# Altium PCB NB3000XN.PcbDoc (part 37 of 71)
Units mil, origin at the board's own origin, x right, y up, seen from the top; angles counter-clockwise.
Board outline 9527.56 x 6929.77 mil, 6 copper layers (Top Layer, GND+SHIELD, MidLayer1, MidLayer2, P2 - 3V3+5V0, Bottom Layer), stack 62.375 mil thick; 832 components, 1027 nets, 4655 pads, 4981 vias.
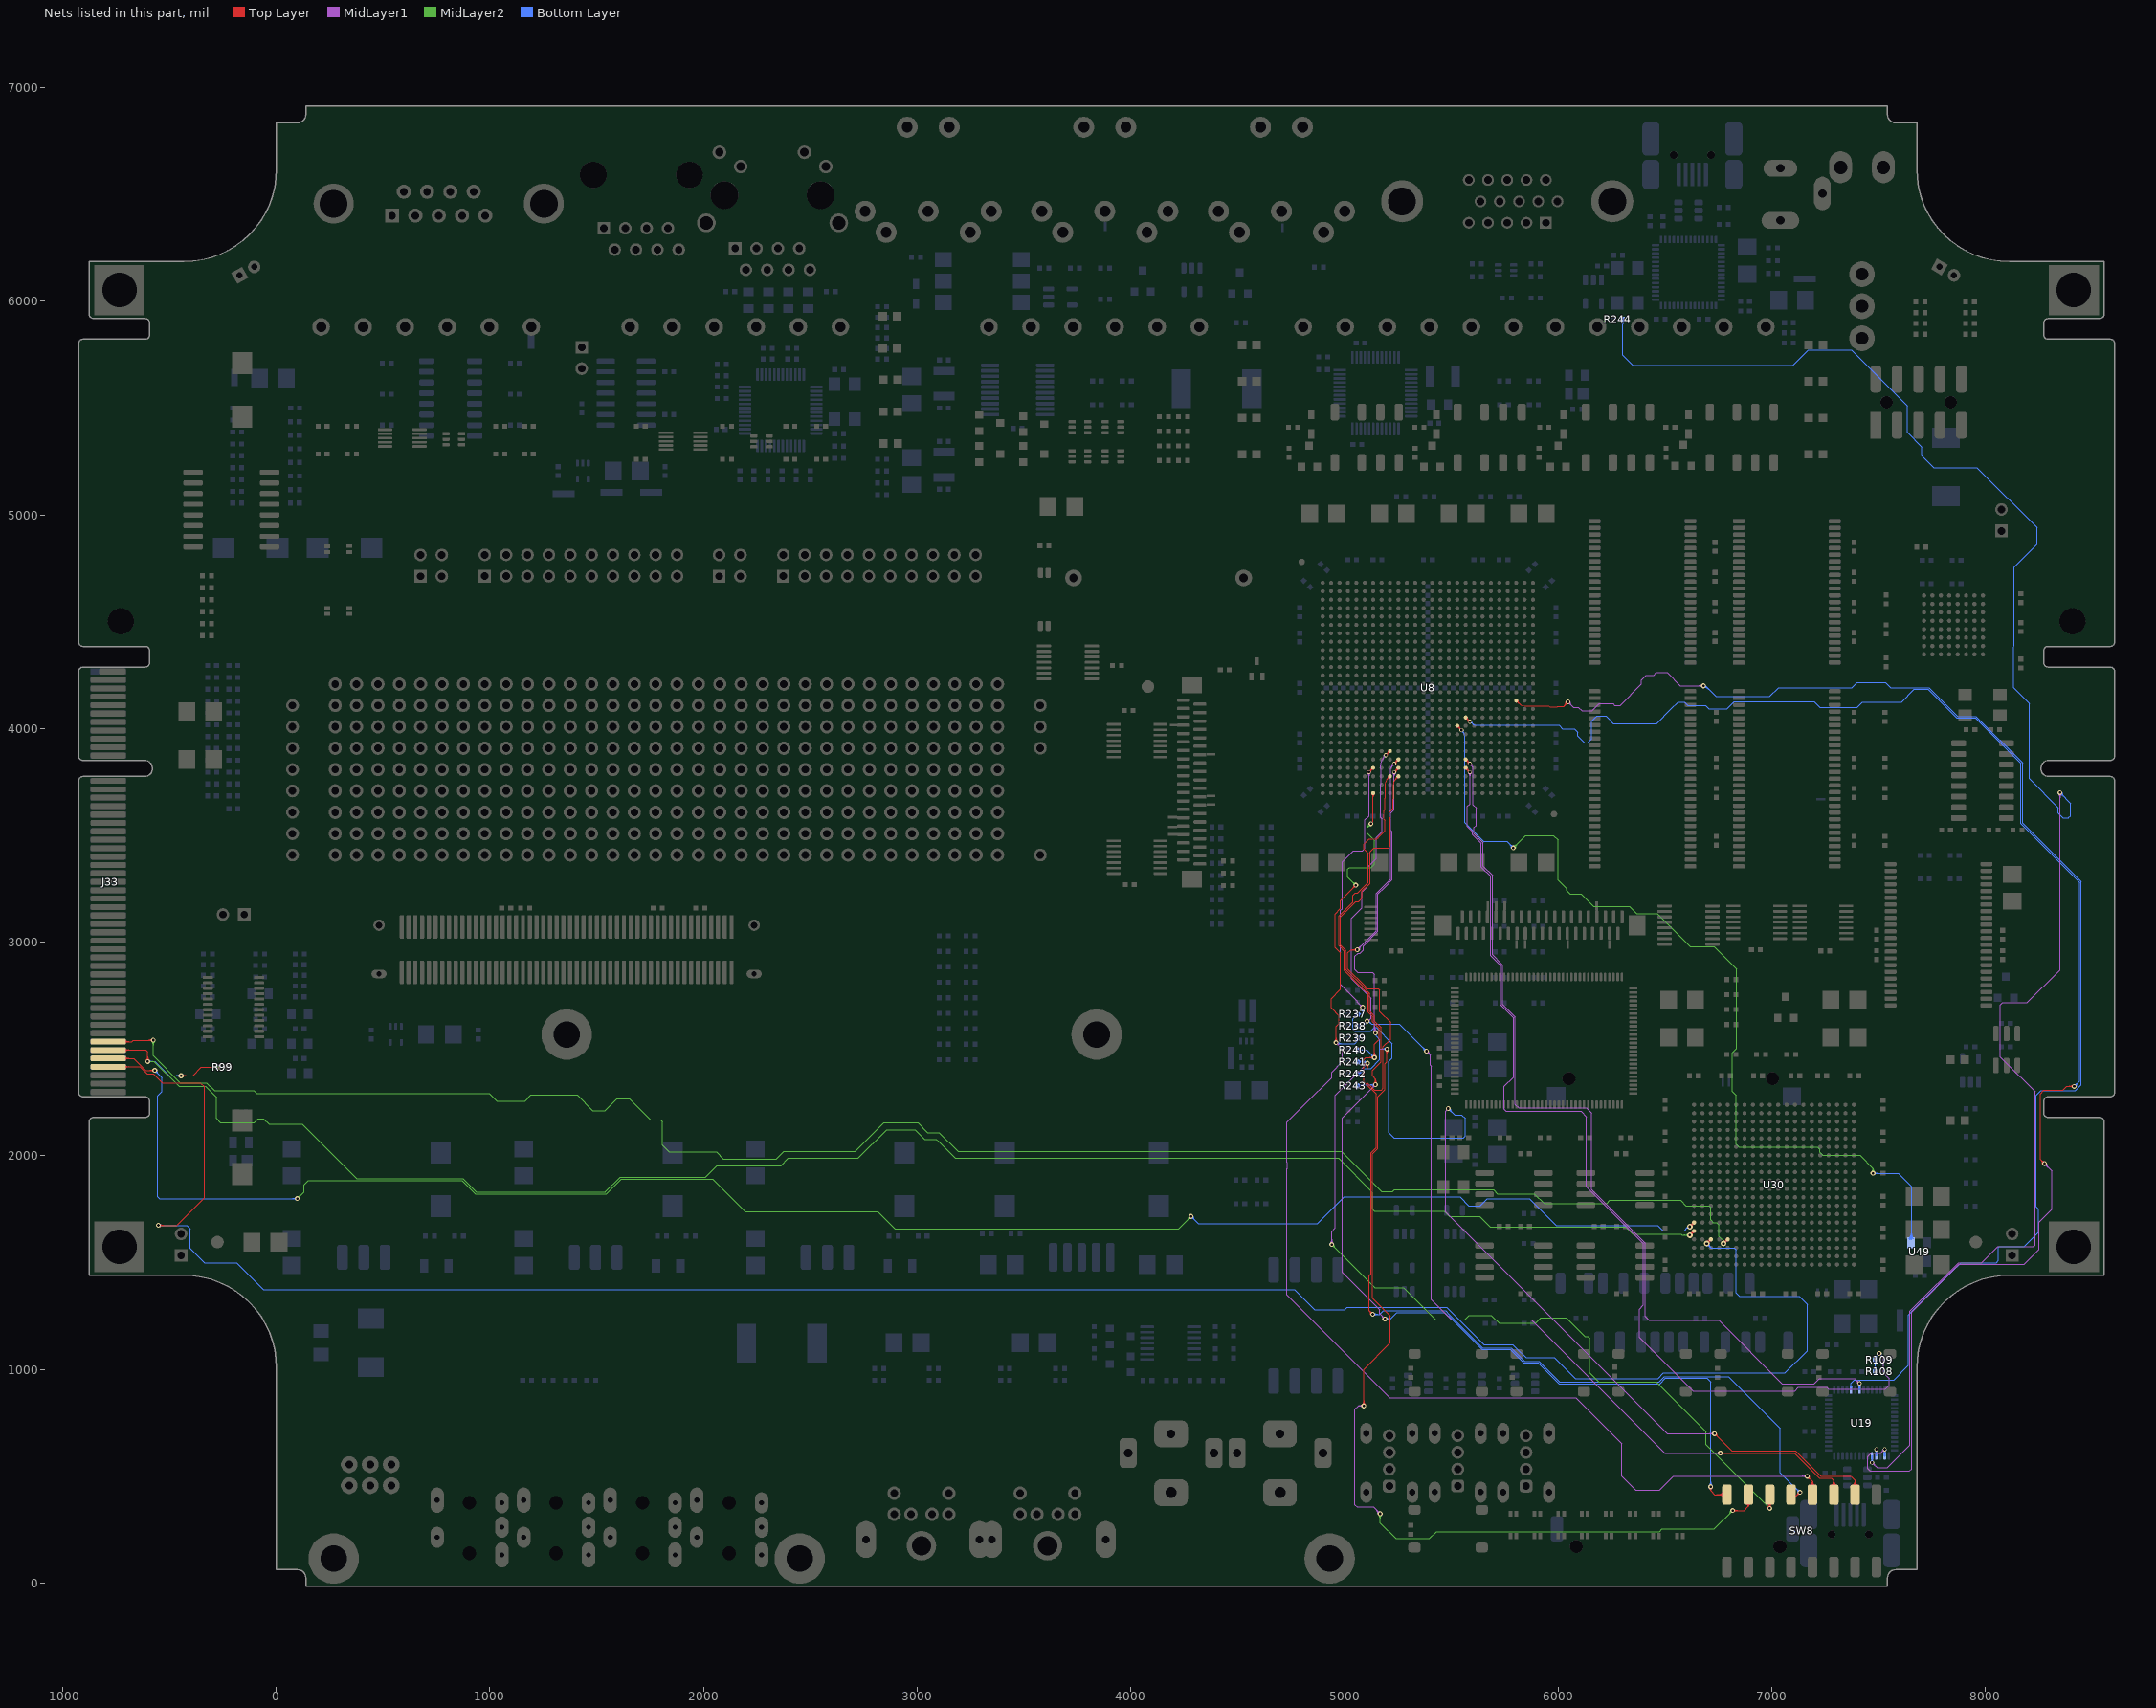
[diagram p41: the nets of this part, all layers, seen from the top]

## Via types
v1: diameter 23, hole 11.81, Top Layer to Bottom Layer, 3672 vias
v2: diameter 26, hole 11.81, Top Layer to Bottom Layer, 461 vias
v3: diameter 19, hole 11.81, Top Layer to Bottom Layer, tented both sides, 396 vias
v4: diameter 23.62, hole 11.81, Top Layer to Bottom Layer, 288 vias
v5: diameter 20, hole 11.81, Top Layer to Bottom Layer, 91 vias
v6: diameter 23, hole 11.81, Top Layer to Bottom Layer, tented both sides, 50 vias
v7: diameter 31, hole 11.81, Top Layer to Bottom Layer, 15 vias
v8: diameter 27.56, hole 11.81, Top Layer to Bottom Layer, tented both sides, 4 vias
v9: diameter 29, hole 11.81, Top Layer to Bottom Layer, 3 vias
v10: diameter 21, hole 11.81, Top Layer to Bottom Layer, 1 vias

## Nets (pads, with @x,y where several pads share a name; then routed paths per layer and width w, separated by ;. In a path a pad name is that pad's centre, name@x,y a point inside that pad or via, vN(x,y) a via of type N, cw(c..) or ccw(c..) an arc to the next point about the centre after c; other vN are vias at no path point) (continued)
DBUSB.READY: U8.R24 U19.33 | length 6898
  Top Layer w4: U8.R24@5803.39,4123.6 cw(c5803.39,4105.88) 5815.92,4118.41 ; U8.R24@5810.73,4130.94 ccw(c5828.45,4130.94) 5815.92,4118.41 ; v1@6036.69,4125.04 cw(c6013.76,4125.04) 6029.97,4108.82 cw(c6046.19,4092.61) v1@6046.19,4115.54 ; v1@6037.01,4125.04 v1(6046.19,4125.04) 6026,4104.85 5997.48,4104.85 5994.33,4101.71 5960.72,4101.71 5955.35,4107.08 5924.74,4107.08 5920,4107.08 5910,4107.08 5843.27,4107.08 cw(c5843.27,4145.76) 5815.92,4118.41 ; v1@6040.69,4125.04 cw(c6027.41,4125.04) 6036.8,4115.65 cw(c6046.19,4106.26) v1@6046.19,4119.54
  MidLayer1 w4: v1@6046.19,4115.54 cw(c6046.19,4092.61) 6062.41,4108.82 cw(c6078.63,4125.04) v1@6055.69,4125.04 ; v1@6046.19,4119.54 cw(c6046.19,4106.26) 6055.58,4115.65 cw(c6064.97,4125.04) v1@6051.69,4125.04 ; v1(6046.19,4125.04) 6071.23,4100 6095,4100 6111.63,4083.37 6159.23,4083.37 6192.56,4116.71 6256.86,4116.71 6265.19,4108.37 6290.19,4108.37 6390.19,4208.37 6390.19,4228.02 6412.21,4250.04 6447.67,4250.04 6459.34,4261.71 6509.52,4261.71 6571.19,4200.04 v1(6680.19,4200.04) ; v1@6673.47,4193.32 ccw(c6657.26,4177.11) 6657.26,4200.04 ccw(c6657.26,4222.98) v1@6673.47,4206.76 ; v1@6676.3,4196.15 ccw(c6666.91,4186.76) 6666.91,4200.04 ccw(c6666.91,4213.32) v1@6676.3,4203.93
  Bottom Layer w4: v1@6680.19,4190.54 cw(c6680.19,4146.68) 6711.2,4177.69 ; v1@6680.19,4194.54 cw(c6680.19,4160.34) 6704.37,4184.52 ; v1@6680.19,4198.54 cw(c6680.19,4174) 6697.55,4191.35 ; v1(6680.19,4200.04) 6688.86,4200.04 6738.86,4150.04 6990.19,4150.04 7032.19,4192.04 7374.19,4192.04 7398.52,4216.37 7430,4216.37 7444.19,4216.37 7532.35,4216.37 7557.02,4191.71 7575,4191.71 7734.84,4191.71 7868.84,4057.71 7955.15,4057.71 8173.52,3839.34 8173.52,3557.79 8448,3283.31 8448,2333.25 8420.68,2305.94 8260.38,2305.94 8238,2283.56 8238,1760.5 8248.36,1750.14 ; U19.33@7367.96,918.09 ccw(c7361.13,924.92) 7370.79,924.92 ccw(c7380.44,924.92) U19.33@7373.62,918.09 ; U19.33@7370.79,904.33 7370.79,935.66 7386.84,951.71 7571.71,951.71 7640,1020 7640,1255.2 7843.17,1458.37 ; 7843.37,1458.37 7885.37,1500.37 8050.37,1500.37 8060,1510 8060,1570 8065,1575 8180,1575 8248.36,1643.36 8248.36,1750.14 ; 8239.19,1759.31 8248.36,1750.14
DBUSB.RESET_N: U8.V17 U49.3 | length 4668.6
  Top Layer w4: U8.V17@5527.8,4005.33 cw(c5527.8,3987.23) 5540.6,4000.03 cw(c5553.4,4012.83) U8.V17@5535.3,4012.83 ; U8.V17@5527.8,4005.49 cw(c5527.8,3987.77) 5540.33,4000.3 cw(c5552.86,4012.83) U8.V17@5535.14,4012.83 ; U8.V17@5527.8,4012.83 v3(5547.48,3993.15) ; 5534.68,4005.95 cw(c5521.87,3993.15) 5539.98,3993.15 ccw(c5521.87,3993.15) 5534.68,4005.95 ; 5534.68,4005.95 ccw(c5547.48,4018.76) 5547.48,4000.65 cw(c5547.48,4018.76) 5534.68,4005.95
  MidLayer2 w4: v1(5790.19,3441.71) 5848.52,3500.04 5978.17,3500.04 5998.86,3479.35 5998.86,3290.95 6012.62,3277.19 6012.71,3277.19 6040.19,3249.71 6040.19,3241.71 6056.86,3225.04 6106.86,3225.04 6165.19,3166.71 6333.52,3166.71 6366.86,3133.37 6462.52,3133.37 6616.86,2979.04 6729.84,2979.04 6835.52,2873.35 6835.52,2503.71 6815.19,2483.37 6815.19,2300.37 6832.19,2283.37 6832.19,2099.96 ; v1@5790.19,3447.21 ccw(c5790.19,3460.49) 5799.58,3451.1 ccw(c5808.97,3441.71) v1@5795.69,3441.71 ; v1@5790.19,3451.21 ccw(c5790.19,3474.14) 5806.41,3457.93 ccw(c5822.63,3441.71) v1@5799.69,3441.71 ; 6832.15,2100 6832.19,2099.96 ; v1@7467.01,1925.62 ccw(c7452.8,1940.71) 7473.52,1940.71 ; v1@7469.75,1922.71 ccw(c7461.53,1931.44) 7473.52,1931.44 ccw(c7485.52,1931.44) v1@7477.3,1922.71 ; v1(7473.52,1918.71) 7473.52,1940.71 ; v1@7480.04,1925.62 cw(c7494.25,1940.71) 7473.52,1940.71 ; 6832.19,2099.96 6833.52,2098.63 6833.52,2053.98 6846.02,2041.48 7214.72,2041.48 7225.85,2030.35 7225.85,2015.98 7238.35,2003.48 7338.89,2003.48 7340,2002.37 7411.86,2002.37 7473.52,1940.71
  Bottom Layer w4: v3@5546.18,3985.76 cw(c5543.03,3967.93) 5557.87,3978.32 cw(c5572.7,3988.7) v3@5554.87,3991.85 ; 5557.9,3978.29 cw(c5529.86,3960.64) 5562.99,3960.47 5562.99,3876.1 5562.99,3670 5562.99,3660 5562.99,3558.91 5573.65,3548.24 5650.19,3471.71 5760.19,3471.71 v1(5790.19,3441.71) ; v1@5780.69,3441.71 ccw(c5757.76,3441.71) 5773.97,3457.93 ccw(c5790.19,3474.14) v1@5790.19,3451.21 ; v1@5784.69,3441.71 ccw(c5771.41,3441.71) 5780.8,3451.1 ccw(c5790.19,3460.49) v1@5790.19,3447.21 ; v1(7473.52,1918.71) 7591.29,1918.71 7655,1855 U49.3@7655,1607 ; v1@7477.41,1914.82 cw(c7486.8,1905.43) 7486.8,1918.71 cw(c7486.8,1931.99) v1@7477.41,1922.6 ; v1@7480.24,1911.99 cw(c7496.46,1895.77) 7496.46,1918.71 cw(c7496.46,1941.64) v1@7480.24,1925.43 ; U49.3@7641.03,1613.28 ccw(c7607.31,1647) 7655,1647 ; U49.3@7643.86,1610.45 ccw(c7616.97,1637.34) 7655,1637.34 ; U49.3@7646.69,1607.62 ccw(c7626.63,1627.69) 7655,1627.69 ; 7655,1623.56 ccw(c7673.54,1623.56) U49.3@7660.43,1610.45 ; 7655,1633.22 ccw(c7683.2,1633.22) U49.3@7663.26,1613.28
DBUSB.SLOE: U8.AB18 U19.35 | length 4508.8
  Top Layer w4: U8.AB18@5567.17,3847.85 cw(c5567.17,3829.75) 5579.97,3842.55 cw(c5592.77,3855.35) U8.AB18@5574.67,3855.35 ; U8.AB18@5567.17,3848.01 cw(c5567.17,3830.29) 5579.7,3842.82 cw(c5592.23,3855.35) U8.AB18@5574.51,3855.35 ; U8.AB18@5567.17,3855.35 v3(5586.85,3835.67) ; 5574.05,3848.47 cw(c5561.24,3835.67) 5579.35,3835.67 ccw(c5561.24,3835.67) 5574.05,3848.47 ; 5574.05,3848.47 ccw(c5586.85,3861.28) 5586.85,3843.17 cw(c5586.85,3861.28) 5574.05,3848.47
  MidLayer1 w4: v3@5586.2,3828.2 cw(c5584.62,3810.16) 5598.49,3821.8 cw(c5612.36,3833.44) v3@5594.32,3835.02 ; 5598.24,3822.09 cw(c5588.31,3812.16) 5602.36,3812.16 5602.36,3718.62 5602.36,3670 5602.36,3660 5602.36,3642.64 5616.19,3628.81 5616.19,3545.69 5606.86,3536.35 5606.86,3508.04 5648.52,3466.37 5648.52,3356.68 5692.19,3313.02 5692.19,2940.98 5730.85,2902.32 5740.19,2892.98 5740.19,2708.37 5798.52,2650.04 5798.52,2241.71 5815.19,2225.04 6131.86,2225.04 6156.86,2200.04 6156.86,1841.71 6406.81,1591.75 6406.81,1248.19 6425,1230 6751.9,1230 7048.52,933.37 7198.52,933.37 7223.52,958.37 7387.44,958.37 v5(7410.16,935.66) ; v5@7402.16,935.66 ccw(c7382.84,935.66) 7396.5,949.32 ccw(c7410.16,962.98) v5@7410.16,943.66
  Bottom Layer w8: v5@7405.91,931.42 cw(c7395.67,921.18) 7410.16,921.18 cw(c7424.64,921.18) v5@7414.4,931.42 ; U19.35@7410.16,904.33 v5(7410.16,935.66)
DBUSB.VBUS: R108.1 R109.1 U8.AC18 | length 5262
  Top Layer w4: U8.AC18@5567.17,3808.48 cw(c5567.17,3790.38) 5579.97,3803.18 cw(c5592.77,3815.98) U8.AC18@5574.67,3815.98 ; U8.AC18@5567.17,3808.64 cw(c5567.17,3790.92) 5579.7,3803.45 cw(c5592.23,3815.98) U8.AC18@5574.51,3815.98 ; U8.AC18@5567.17,3815.98 v3(5586.85,3796.3) ; 5574.05,3809.1 cw(c5561.24,3796.3) 5579.35,3796.3 ccw(c5561.24,3796.3) 5574.05,3809.1 ; 5574.05,3809.1 ccw(c5586.85,3821.91) 5586.85,3803.8 cw(c5586.85,3821.91) 5574.05,3809.1
  MidLayer1 w4: v3@5581.55,3791 cw(c5568.74,3778.19) 5586.85,3778.19 cw(c5604.96,3778.19) v3@5592.15,3791 ; v3@5581.66,3791.11 cw(c5569.12,3778.57) 5586.85,3778.57 cw(c5604.58,3778.57) v3@5592.04,3791.11 ; v3(5586.85,3796.3) 5586.85,3718.62 5586.85,3670 5586.85,3660 5586.85,3646.66 5575.19,3635 5575.19,3541.12 5598.86,3517.46 5598.86,3504.71 5612.27,3491.29 5640.19,3463.37 5640.19,3352.37 5684.19,3308.37 5684.19,2937.67 5731.86,2890 5731.86,2705.39 5790.52,2646.73 5790.52,2368.02 5747.5,2325 5747.5,2217.73 5756.86,2208.37 6106.86,2208.37 6131.86,2183.37 6131.86,1855.39 6377.04,1610.21 6398.81,1588.44 6398.81,1301.18 6380.52,1282.9 6380.52,1149.61 6630.43,899.71 7108,899.71 7125,916.71 7256.86,916.71 7265.19,908.37 7531.86,908.37 7548.52,925.04 7548.52,958.37 7523.52,983.37 7523.52,1054.04 v1(7502.52,1075.04) ; v1@7502.52,1065.54 cw(c7502.52,1042.61) 7518.74,1058.82 cw(c7534.96,1075.04) v1@7512.02,1075.04 ; v1@7502.52,1069.54 cw(c7502.52,1056.26) 7511.91,1065.65 cw(c7521.3,1075.04) v1@7508.02,1075.04
  Bottom Layer w4: R108.1@7477.23,997.08 ccw(c7461.32,1012.99) 7483.82,1012.99 ccw(c7506.32,1012.99) R108.1@7490.41,997.08 ; R109.1@7477.23,1037.92 cw(c7461.32,1022.01) 7483.82,1022.01 cw(c7506.32,1022.01) R109.1@7490.41,1037.92 ; R108.1@7480.06,994.25 ccw(c7470.98,1003.33) 7483.82,1003.33 ccw(c7496.66,1003.33) R108.1@7487.58,994.25 ; R109.1@7480.06,1040.75 cw(c7470.98,1031.67) 7483.82,1031.67 cw(c7496.66,1031.67) R109.1@7487.58,1040.75 ; R108.1@7483.82,990 R109.1@7483.82,1041.71 ; R109.1@7483.82,1045 R109.1@7483.82,1041.71 ; R109.1@7485.14,1045.57 cw(c7501.49,1046.51) 7489.91,1058.09 ; R109.1@7489.13,1045.8 cw(c7513.42,1047.2) 7496.21,1064.4 ; 7492.36,1060.54 ccw(c7486.07,1066.83) v1@7494.02,1070.8 ; R109.1@7493.12,1046.03 cw(c7525.35,1047.88) v1@7502.52,1070.71 ; 7493.7,1061.89 cw(c7502.52,1053.07) v1@7502.52,1065.54 ; 7496.28,1064.47 ccw(c7491.31,1069.44) v1@7497.6,1072.58 ; v1(7502.52,1075.04) v1@7502.52,1070.71 ; R109.1@7483.82,1041.71 7485.47,1043.35 7490.19,1048.08 7490.19,1058.37 v1@7502.52,1070.71 ; R109.1@7483.82,1054.81 ccw(c7483.82,1061.59) 7488.61,1056.8 cw(c7483.82,1061.59) R109.1@7483.82,1054.81
DBUSB.WR_N: U8.U18 U19.2 | length 7864.3
  Top Layer w4: U8.U18@5567.17,4044.7 cw(c5567.17,4026.6) 5579.97,4039.4 cw(c5592.77,4052.2) U8.U18@5574.67,4052.2 ; U8.U18@5567.17,4044.86 cw(c5567.17,4027.14) 5579.7,4039.67 cw(c5592.23,4052.2) U8.U18@5574.51,4052.2 ; U8.U18@5567.17,4052.2 v3(5586.85,4032.52) ; v1@8266.73,1964 ccw(c8243.8,1964) 8260.02,1980.22 ccw(c8276.23,1996.43) v1@8276.23,1973.5 ; v1@8270.73,1964 ccw(c8257.46,1964) 8266.85,1973.39 ccw(c8276.23,1982.78) v1@8276.23,1969.5 ; v1(8276.23,1964) 8256.86,1983.37 8256.86,2290.54 8273.31,2307 8362,2307 8380.04,2325.04 8414.96,2325.04 v1(8415,2325) ; 8391.97,2325.04 cw(c8391.97,2301.97) v1@8408.28,2318.28 ; 8392.16,2325.04 ccw(c8392.16,2347.84) v1@8408.28,2331.72 ; 8401.62,2325.04 cw(c8401.62,2311.62) v1@8411.11,2321.11 ; 8401.82,2325.04 ccw(c8401.82,2338.18) v1@8411.11,2328.89 ; 5574.05,4045.32 cw(c5561.24,4032.52) 5579.35,4032.52 ccw(c5561.24,4032.52) 5574.05,4045.32 ; 5574.05,4045.32 ccw(c5586.85,4058.13) 5586.85,4040.02 cw(c5586.85,4058.13) 5574.05,4045.32
  MidLayer1 w4: v5@7520.27,627 cw(c7500.95,627) 7514.61,613.34 cw(c7528.27,599.69) v5@7528.27,619 ; v5(7528.27,627) 7509.64,608.37 7465.19,608.37 7448.52,591.71 7448.52,536.48 7460,525 7644.38,525 7654.02,534.64 7654.02,1269.23 7876.51,1491.71 8180,1491.71 8250,1561.71 8250,1690 8310,1750 8310,1930.23 v1(8276.23,1964) v1@8276.11,1964.12 ; v1@8276.23,1954.5 cw(c8276.23,1931.56) 8292.45,1947.78 cw(c8308.67,1964) v1@8285.73,1964 ; v1@8276.23,1958.5 cw(c8276.23,1945.22) 8285.62,1954.61 cw(c8295.01,1964) v1@8281.73,1964
  Bottom Layer w4: v3@5587.5,4025.05 cw(c5589.08,4007.01) 5600.72,4020.88 cw(c5612.36,4034.75) v3@5594.32,4033.17 ; 5600.43,4021.13 ccw(c5610.36,4031.06) 5610.36,4017.01 5703.9,4017.01 5910,4017.01 5920,4017.01 5924.74,4017.01 5928.74,4017.01 5928.74,4016.71 6003.86,4016.71 6021.06,3999.5 6075.25,3999.5 6092.5,3982.25 6092.5,3963.98 6123.12,3933.37 6137.61,3933.37 6156.86,3952.61 6156.86,4033.37 6181.86,4058.37 6223.52,4058.37 6257.69,4024.21 6460.77,4024.21 6528.19,4091.63 6528.19,4091.71 6561.52,4125.04 6590.19,4125.04 6606.86,4108.37 6688.86,4108.37 6705.52,4091.71 6790,4091.71 6824.33,4126.04 7198.96,4126.04 7224.96,4100.04 7398.52,4100.04 7423.52,4125.04 7606.67,4125.04 7665,4183.37 7731.86,4183.37 7865.52,4049.71 7951.84,4049.71 8165.19,3836.36 8165.19,3554.81 8440,3280 8440,2350 v1(8415,2325) ; v1@8415,2330.5 ccw(c8415,2343.78) 8424.39,2334.39 ccw(c8433.78,2325) v1@8420.5,2325 ; v1@8415,2334.5 ccw(c8415,2357.43) 8431.22,2341.22 ccw(c8447.44,2325) v1@8424.5,2325
  Bottom Layer w8: v5@7524.03,622.76 cw(c7513.78,612.51) 7528.27,612.51 cw(c7542.75,612.51) v5@7532.51,622.76 ; U19.2@7528.27,595.67 v5(7528.27,627)
DBUSB.XTALIN: R244.1 U19.5 | length 8457.5
  MidLayer1 w4: v5@7469.21,556.34 cw(c7469.21,537.02) 7482.87,550.68 cw(c7496.53,564.34) v5@7477.21,564.34 ; v5(7469.21,564.34) 7493.55,540 7540,540 7646.02,646.02 7646.02,1272.54 7677.84,1304.35 7873.52,1500.04 7981.86,1500.04 8056.86,1575.04 8224.19,1575.04 8231.86,1582.71 8231.86,2300.04 8094.47,2437.43 8070,2461.9 8070,2706.71 8080,2716.71 8195.23,2716.71 8348.52,2870 v1(8348.52,3700.04) ; v1@8341.81,3693.32 cw(c8325.59,3677.11) 8348.52,3677.11 cw(c8371.46,3677.11) v1@8355.24,3693.32 ; v1@8344.64,3696.15 cw(c8335.25,3686.76) 8348.52,3686.76 cw(c8361.8,3686.76) v1@8352.41,3696.15
  Bottom Layer w4: R244.1@6294.59,5907.92 cw(c6278.68,5892.01) 6301.18,5892.01 cw(c6323.68,5892.01) R244.1@6307.77,5907.92 ; R244.1@6297.42,5910.75 cw(c6288.34,5901.67) 6301.18,5901.67 cw(c6314.02,5901.67) R244.1@6304.94,5910.75 ; R244.1@6301.18,5915 6301.18,5747.38 6348.52,5700.04 7098.52,5700.04 7170.48,5772 7372.36,5772 7633.75,5510.61 7633.75,5386.25 7701.98,5318.02 7701.98,5278.02 7758.88,5221.12 7960.17,5221.12 8240.69,4940.6 8240.69,4862 8135,4756.31 8135,4385 8131.86,4381.86 8131.86,4191.37 8206.52,4116.71 8206.52,3764.53 8341.06,3630 8341.06,3603.94 8362.13,3582.87 8389.69,3582.87 8390.19,3583.37 8398.52,3591.71 8399.02,3592.21 8399.02,3649.54 v1(8348.52,3700.04) ; v1@8348.52,3690.54 cw(c8348.52,3667.61) 8364.74,3683.82 cw(c8380.96,3700.04) v1@8358.02,3700.04 ; v1@8348.52,3694.54 cw(c8348.52,3681.26) 8357.91,3690.65 cw(c8367.3,3700.04) v1@8354.02,3700.04
  Bottom Layer w8: v5@7464.97,568.58 ccw(c7454.73,578.82) 7469.21,578.82 ccw(c7483.7,578.82) v5@7473.46,568.58 ; v5(7469.21,564.34) U19.5@7469.21,595.67
DBUSB.XTALOUT: U19.4 | length 54.1
  Bottom Layer w8: v5@7484.65,622.76 cw(c7474.41,612.51) 7488.9,612.51 cw(c7503.38,612.51) v5@7493.14,622.76 ; U19.4@7488.9,595.67 v5(7488.9,627)
DIAGCOMMS.DIN: J33.A46 U30.V17 | length 10672.3
  Top Layer w4: J33.A46@-785.98,2416.64 -637.72,2416.64 -605.08,2384 -575.14,2384 -533.18,2342.04 -354.79,2342.04 -335.52,2322.77 -335.52,1804.48 -464.96,1675.04 v1(-551.48,1675.04) ; J33.A46@-711.58,2411.14 cw(c-698.3,2397.86) -698.3,2416.64 cw(c-698.3,2435.42) J33.A46@-711.58,2422.14 ; J33.A46@-708.76,2408.31 cw(c-688.65,2388.2) -688.65,2416.64 cw(c-688.65,2445.08) J33.A46@-708.76,2424.97 ; v1@-547.59,1671.15 cw(c-538.2,1661.76) -538.2,1675.04 cw(c-538.2,1688.32) v1@-547.59,1678.93 ; v1@-544.76,1668.32 cw(c-528.54,1652.11) -528.54,1675.04 cw(c-528.54,1697.98) v1@-544.76,1681.76
  Top Layer w8: v2(6695.04,1589.41) U30.V17@6714.72,1609.09 ; v2@6695.04,1598.41 ccw(c6695.04,1620.14) 6710.4,1604.77 ccw(c6725.77,1589.41) v2@6704.04,1589.41 ; U30.V17@6708.88,1609.09 cw(c6694.78,1609.09) 6704.75,1599.12 cw(c6714.72,1589.15) U30.V17@6714.72,1603.25
  Bottom Layer w4: v1(-551.48,1675.04) -418.14,1675.04 -401.48,1658.37 -401.48,1566.71 -334.81,1500.04 -184.81,1500.04 -59.81,1375.04 4765.19,1375.04 4860.23,1280 5000,1280 5011.71,1291.71 5478.88,1291.71 5653.58,1117 5786.92,1117 5813.92,1090 5842.12,1061.8 5848.92,1055 5982.88,1055 6079.5,958.37 6466.84,958.37 6491.84,983.37 7062.06,983.37 7165.52,1086.84 7165.52,1304.48 7128.29,1341.71 6849.52,1341.71 6832.86,1358.37 6832.86,1560.04 6823.52,1569.37 6715.07,1569.37 v2(6695.04,1589.41) ; v1@-547.59,1671.15 cw(c-538.2,1661.76) -538.2,1675.04 cw(c-538.2,1688.32) v1@-547.59,1678.93 ; v1@-544.76,1668.32 cw(c-528.54,1652.11) -528.54,1675.04 cw(c-528.54,1697.98) v1@-544.76,1681.76 ; v2@6695.04,1578.41 cw(c6695.04,1551.85) 6713.82,1570.63 cw(c6732.6,1589.41) v2@6706.04,1589.41 ; v2@6695.04,1582.41 cw(c6695.04,1565.51) 6706.99,1577.46 cw(c6718.94,1589.41) v2@6702.04,1589.41
DIAGCOMMS.DOUT: J33.A43 U30.T17 | length 8639.2
  Top Layer w4: J33.A43@-785.98,2534.75 -675.1,2534.75 -668.14,2541.71 v1(-575.48,2541.71) ; J33.A43@-711.58,2529.25 cw(c-698.3,2515.97) -698.3,2534.75 cw(c-698.3,2553.53) J33.A43@-711.58,2540.25 ; J33.A43@-708.76,2526.42 cw(c-688.65,2506.31) -688.65,2534.75 cw(c-688.65,2563.19) J33.A43@-708.76,2543.08 ; v1@-582.19,2534.99 ccw(c-598.41,2518.77) -598.41,2541.71 ccw(c-598.41,2564.64) v1@-582.19,2548.43 ; v1@-579.36,2537.82 ccw(c-588.75,2528.43) -588.75,2541.71 ccw(c-588.75,2554.99) v1@-579.36,2545.6
  Top Layer w8: v2(6773.78,1589.41) U30.T17@6793.46,1609.09 ; v2@6773.78,1598.41 ccw(c6773.78,1620.14) 6789.14,1604.77 ccw(c6804.51,1589.41) v2@6782.78,1589.41 ; U30.T17@6787.62,1609.09 cw(c6773.52,1609.09) 6783.49,1599.12 cw(c6793.46,1589.15) U30.T17@6793.46,1603.25
  MidLayer2 w4: v1@-582.19,2534.99 cw(c-598.41,2518.77) -575.48,2518.77 cw(c-552.54,2518.77) v1@-568.76,2534.99 ; v1@-579.36,2537.82 cw(c-588.75,2528.43) -575.48,2528.43 cw(c-562.2,2528.43) v1@-571.59,2537.82 ; v1(-575.48,2541.71) -575.48,2468.14 -449.04,2341.71 -325.39,2341.71 -288.69,2305 -105,2305 -92,2292 998,2292 1033,2257 1164.63,2257 1192,2284.37 1409.31,2284.37 1481.69,2212 1539.23,2212 1595.23,2268 1653.35,2268 1751.35,2170 1798.67,2170 1808.67,2160 1808.67,2049.33 1840,2018 2059.67,2018 2091.67,1986 2341,1986 2375.81,2020.81 2710,2020.81 2844.19,2155 3002.5,2155 3048,2109.5 3102.36,2109.5 3191.05,2020.81 4986.09,2020.81 5174.19,1832.71 5225.84,1832.71 5235,1841.87 5697.34,1841.87 5716.5,1822.71 5888.88,1822.71 5934.88,1776.71 6227.56,1776.71 6242.56,1791.71 6573.52,1791.71 6598.52,1766.71 6706.86,1766.71 6715.19,1758.37 6715.19,1699.87 6726.54,1688.52 6740.91,1688.52 6753.41,1676.02 6753.41,1622.28 6773.78,1601.91 v2(6773.78,1589.41)
DIAGCOMMS.FLASH_CS_N: J33.A44 R99.1 U30.Y16 | length 9034.8
  Top Layer w4: J33.A44@-785.98,2495.38 -610.38,2495.38 -601.48,2486.48 v1(-601.48,2441.71) ; J33.A44@-711.58,2489.88 cw(c-698.3,2476.6) -698.3,2495.38 cw(c-698.3,2514.16) J33.A44@-711.58,2500.88 ; J33.A44@-708.76,2487.05 cw(c-688.65,2466.94) -688.65,2495.38 cw(c-688.65,2523.82) J33.A44@-708.76,2503.71 ; v1@-608.19,2448.43 ccw(c-624.41,2464.64) -601.48,2464.64 ccw(c-578.54,2464.64) v1@-594.76,2448.43 ; v1@-605.36,2445.6 ccw(c-614.75,2454.99) -601.48,2454.99 ccw(c-588.2,2454.99) v1@-597.59,2445.6 ; v1(-445,2375) -390,2375 -350,2415 R99.1@-271.18,2415 ; v1@-441.11,2371.11 cw(c-431.72,2361.72) -431.72,2375 cw(c-431.72,2388.28) v1@-441.11,2378.89 ; v1@-438.28,2368.28 cw(c-422.07,2352.06) -422.07,2375 cw(c-422.07,2397.93) v1@-438.28,2381.72 ; R99.1@-277.77,2408.41 ccw(c-293.68,2392.5) -293.68,2415 ccw(c-293.68,2437.5) R99.1@-277.77,2421.59 ; R99.1@-274.94,2411.24 ccw(c-284.02,2402.16) -284.02,2415 ccw(c-284.02,2427.84) R99.1@-274.94,2418.76
  Top Layer w8: v2(6616.3,1628.78) U30.Y16@6635.98,1648.46 ; v2@6616.3,1637.78 ccw(c6616.3,1659.51) 6631.66,1644.14 ccw(c6647.03,1628.78) v2@6625.3,1628.78 ; U30.Y16@6630.14,1648.46 cw(c6616.04,1648.46) 6626.01,1638.49 cw(c6635.98,1628.52) U30.Y16@6635.98,1642.62
  MidLayer2 w4: v1(-601.48,2441.71) -571.67,2441.71 -455,2325.04 -331.35,2325.04 -280,2273.69 -280,2175.13 -260.58,2155.71 -103.29,2155.71 -85,2174 -59,2174 -34,2149 121,2149 377.5,1892.5 873.81,1892.5 936.31,1830 1540,1830 ; 1541.69,1830 1540,1830 ; v2@6608.52,1621 ccw(c6589.74,1602.22) 6589.74,1628.78 ccw(c6589.74,1655.34) v2@6608.52,1636.56 ; v2@6611.35,1623.83 ccw(c6599.4,1611.88) 6599.4,1628.78 ccw(c6599.4,1645.68) v2@6611.35,1633.73 ; v2(6616.3,1628.78) 6615.19,1628.78 6580,1628.78 6575.4,1633.37 6348.52,1633.37 6315.19,1666.71 5681.98,1666.71 5631.69,1717 5492,1717 5467.29,1741.71 5140.19,1741.71 5131.86,1750.04 5131.86,1828.41 4971.46,1988.81 3177.79,1988.81 3099.36,2067.25 3089.11,2077.5 3034.74,2077.5 2989.24,2123 2857.44,2123 2723.26,1988.81 2397.1,1988.81 2362.29,1954 2064,1954 2009.71,1899.71 1609.71,1899.71 1540,1830
  Bottom Layer w4: v1(-601.48,2441.71) -568.33,2441.71 -501.63,2375 v1(-445,2375) ; v1@-597.59,2437.82 cw(c-588.2,2428.43) -588.2,2441.71 cw(c-588.2,2454.99) v1@-597.59,2445.6 ; v1@-594.76,2434.99 cw(c-578.54,2418.77) -578.54,2441.71 cw(c-578.54,2464.64) v1@-594.76,2448.43 ; v1@-451.72,2368.28 ccw(c-467.94,2352.06) -467.94,2375 ccw(c-467.94,2397.93) v1@-451.72,2381.72 ; v1@-448.89,2371.11 ccw(c-458.28,2361.72) -458.28,2375 ccw(c-458.28,2388.28) v1@-448.89,2378.89
DIAGCOMMS.SCLK: J33.A45 U30.Y15 | length 8976.6
  Top Layer w4: J33.A45@-785.98,2456.01 -665.78,2456.01 -609.81,2400.04 v1(-568.14,2400.04) ; J33.A45@-711.58,2450.51 cw(c-698.3,2437.23) -698.3,2456.01 cw(c-698.3,2474.79) J33.A45@-711.58,2461.51 ; J33.A45@-708.76,2447.68 cw(c-688.65,2427.57) -688.65,2456.01 cw(c-688.65,2484.45) J33.A45@-708.76,2464.34 ; v1@-574.86,2393.32 ccw(c-591.08,2377.11) -591.08,2400.04 ccw(c-591.08,2422.98) v1@-574.86,2406.76 ; v1@-572.03,2396.15 ccw(c-581.42,2386.76) -581.42,2400.04 ccw(c-581.42,2413.32) v1@-572.03,2403.93
  Top Layer w8: v2(6616.3,1668.15) U30.Y15@6635.98,1687.83 ; v2@6616.3,1677.15 ccw(c6616.3,1698.88) 6631.66,1683.51 ccw(c6647.03,1668.15) v2@6625.3,1668.15 ; U30.Y15@6630.14,1687.83 cw(c6616.04,1687.83) 6626.01,1677.86 cw(c6635.98,1667.89) U30.Y15@6635.98,1681.99
  MidLayer2 w4: v1(98.52,1800.04) 130.12,1831.64 130.12,1865.12 149.5,1884.5 870.5,1884.5 933,1822 1545,1822 1614.71,1891.71 2043.29,1891.71 2195,1740 2815,1740 2897,1658 4223.15,1658 v1(4281.86,1716.71) ; v1@98.52,1805.54 ccw(c98.52,1818.82) 107.91,1809.43 ccw(c117.3,1800.04) v1@104.02,1800.04 ; v1@98.52,1809.54 ccw(c98.52,1832.48) 114.74,1816.26 ccw(c130.96,1800.04) v1@108.02,1800.04 ; v1@4272.36,1716.71 cw(c4249.42,1716.71) 4265.64,1700.49 cw(c4281.86,1684.27) v1@4281.86,1707.21 ; v1@4276.36,1716.71 cw(c4263.08,1716.71) 4272.47,1707.32 cw(c4281.86,1697.93) v1@4281.86,1711.21
  Bottom Layer w4: v1@-568.14,2390.54 cw(c-568.14,2367.61) -551.93,2383.82 cw(c-535.71,2400.04) v1@-558.64,2400.04 ; v1@-568.14,2394.54 cw(c-568.14,2381.26) -558.75,2390.65 cw(c-549.36,2400.04) v1@-562.64,2400.04 ; v1(-568.14,2400.04) -535,2366.9 -535,2300 -555,2280 -555,1809 -546.04,1800.04 v1(98.52,1800.04) ; v1@91.81,1793.32 ccw(c75.59,1777.11) 75.59,1800.04 ccw(c75.59,1822.98) v1@91.81,1806.76 ; v1@94.64,1796.15 ccw(c85.25,1786.76) 85.25,1800.04 ccw(c85.25,1813.32) v1@94.64,1803.93 ; v1@4281.86,1707.21 cw(c4281.86,1684.27) 4298.07,1700.49 cw(c4314.29,1716.71) v1@4291.36,1716.71 ; v1@4281.86,1711.21 cw(c4281.86,1697.93) 4291.25,1707.32 cw(c4300.64,1716.71) v1@4287.36,1716.71 ; v1(4281.86,1716.71) 4298.7,1699.86 4314.86,1683.71 4873.86,1683.71 4998.52,1808.37 5540.35,1808.37 5582.02,1766.71 5634.84,1766.71 5668.17,1800.04 5864.96,1800.04 5989.96,1675.04 6465.19,1675.04 6490.19,1650.04 6590.19,1650.04 6606.86,1666.71 6615.19,1666.71 6615.19,1668.15 v2(6616.3,1668.15) ; 6592.46,1652.31 cw(c6613.97,1630.8) v2@6615.86,1661.16 ; 6598.73,1658.58 cw(c6614.71,1642.6) v2@6616.11,1665.16 ; 6603.18,1663.03 ccw(c6598.06,1668.15) v2@6605.3,1668.15
DIPSW.D0: R243.1 SW8.16 U8.AD10 | length 6020.4
  Top Layer w4: v1@5138.47,2340.09 ccw(c5122.26,2356.31) 5145.19,2356.31 ccw(c5168.13,2356.31) v1@5151.91,2340.09 ; v1@5141.3,2337.26 ccw(c5131.91,2346.65) 5145.19,2346.65 ccw(c5158.47,2346.65) v1@5149.08,2337.26 ; v1(5145.19,2333.37) 5145.19,2359.81 5130,2375 5130,2400 5170.5,2440.5 5170.5,2600.34 5139.69,2631.15 5139.69,2655.58 5118.5,2676.77 5118.5,2760.11 5087.73,2790.87 5087.63,2790.87 5006.52,2871.98 5006.52,2961.33 4981.52,2986.33 4981.52,3118.75 5052.78,3190 5066.86,3190 5081.86,3205 5081.86,3238.71 5118.86,3275.71 5118.86,3423.37 5137.19,3441.71 5206.71,3441.71 5214.02,3449.02 5214.02,3580.48 5209.02,3585.48 5209.02,3606.6 5228.34,3625.92 5228.34,3660 5228.34,3670 5228.34,3736.73 ; v1@6708.13,443.79 cw(c6699.44,432.29) 6713.86,432.29 ; v1(6713.86,451.37) 6713.86,432.29 ; v1@6719.58,443.79 ccw(c6728.27,432.29) 6713.86,432.29 ; SW8.16@6775.69,399.98 ccw(c6741.13,365.42) 6741.13,414.29 ccw(c6741.12,463.17) SW8.16@6775.69,428.61 ; SW8.16@6778.51,402.81 ccw(c6750.78,375.08) 6750.78,414.29 ccw(c6750.78,453.51) SW8.16@6778.51,425.78 ; SW8.16@6781.34,405.63 ccw(c6760.44,384.73) 6760.44,414.29 ccw(c6760.44,443.85) SW8.16@6781.34,422.95 ; SW8.16@6790,414.29 6731.86,414.29 6713.86,432.29 ; 5228.34,3736.73 cw(c5267.02,3736.73) 5239.67,3764.08 ; 5228.34,3736.73 cw(c5267.02,3736.73) 5239.67,3764.08 ; 5239.67,3764.08 cw(c5252.2,3751.55) 5252.2,3769.27 ccw(c5252.2,3751.55) 5239.67,3764.08 ; 5239.67,3764.08 ccw(c5227.14,3776.61) 5244.86,3776.61 cw(c5227.14,3776.61) 5239.67,3764.08
  MidLayer1 w4: v1@5135.69,2333.37 cw(c5112.76,2333.37) 5128.97,2317.16 cw(c5145.19,2300.94) v1@5145.19,2323.87 ; v1@5139.69,2333.37 cw(c5126.41,2333.37) 5135.8,2323.99 cw(c5145.19,2314.6) v1@5145.19,2327.87 ; v1(5145.19,2333.37) 4990.19,2178.37 4990.19,1454.81 5164.19,1280.81 5164.19,1261.37 v1(5189.19,1236.37) ; v1@5179.69,1236.37 ccw(c5156.76,1236.37) 5172.97,1252.59 ccw(c5189.19,1268.81) v1@5189.19,1245.87 ; v1@5183.69,1236.37 ccw(c5170.41,1236.37) 5179.8,1245.76 ccw(c5189.19,1255.15) v1@5189.19,1241.87
  Bottom Layer w4: R243.1@5061.18,2327.73 5061.18,2333.37 v1(5145.19,2333.37) ; R243.1@5062.11,2327.29 cw(c5076.81,2312.59) 5076.81,2333.37 ; R243.1@5064.94,2324.46 cw(c5086.47,2302.93) 5086.47,2333.37 ; R243.1@5067.77,2321.63 cw(c5096.13,2293.27) 5096.13,2333.37 ; v1@5138.47,2326.66 ccw(c5122.26,2310.44) 5122.26,2333.37 ccw(c5122.26,2356.31) v1@5138.47,2340.09 ; v1@5141.3,2329.49 ccw(c5131.91,2320.1) 5131.91,2333.37 ccw(c5131.91,2346.65) v1@5141.3,2337.26 ; v1(5189.19,1236.37) 5215,1236.37 5246,1267.37 5469.27,1267.37 5500.27,1236.37 5643.64,1093 5776.98,1093 5838.98,1031 5906.63,1031 6003.92,933.71 6476.11,933.71 6501.45,959.04 6695.96,959.04 6713.86,941.14 v1(6713.86,451.37) ; v1@5193.08,1232.49 cw(c5202.47,1223.1) 5202.47,1236.37 cw(c5202.47,1249.65) v1@5193.08,1240.26 ; v1@5195.91,1229.66 cw(c5212.13,1213.44) 5212.13,1236.37 cw(c5212.13,1259.31) v1@5195.91,1243.09 ; v1@6707.14,458.09 ccw(c6690.92,474.31) 6713.86,474.31 ccw(c6736.79,474.31) v1@6720.57,458.09 ; v1@6709.97,455.26 ccw(c6700.58,464.65) 6713.86,464.65 ccw(c6727.14,464.65) v1@6717.75,455.26
DIPSW.D1: R242.1 SW8.15 U8.AC10 | length 6955.3
  Top Layer w4: v4@5083.06,836.94 ccw(c5066.31,853.69) 5090,853.69 ccw(c5113.69,853.69) v4@5096.94,836.94 ; v4@5085.89,834.11 ccw(c5075.97,844.03) 5090,844.03 ccw(c5104.03,844.03) v4@5094.11,834.11 ; v4(5090,830) 5090,1000 5214.69,1124.69 5214.69,1250.54 5201.08,1264.15 5130.52,1334.71 5130.52,1433.37 5131.86,1434.71 5131.86,2010.73 5156,2034.87 5156,2275.81 5190.19,2310 5190.19,2431 5198.52,2439.34 v1(5198.52,2500.04) ; v1@5191.81,2493.32 cw(c5175.59,2477.11) 5198.52,2477.11 cw(c5221.46,2477.11) v1@5205.24,2493.32 ; v1@5194.64,2496.15 cw(c5185.25,2486.76) 5198.52,2486.76 cw(c5211.8,2486.76) v1@5202.41,2496.15 ; v3(5232.52,3796.3) U8.AC10@5252.2,3815.98 ; U8.AC10@5244.7,3815.98 cw(c5226.6,3815.98) 5239.4,3803.18 cw(c5252.2,3790.38) U8.AC10@5252.2,3808.48 ; U8.AC10@5244.86,3815.98 cw(c5227.14,3815.98) 5239.67,3803.45 cw(c5252.2,3790.92) U8.AC10@5252.2,3808.64 ; v1(6816.86,340.04) 6871.67,340.04 6890,358.37 ; v1@6820.75,336.15 cw(c6830.14,326.76) 6830.14,340.04 cw(c6830.14,353.32) v1@6820.75,343.93 ; v1@6823.57,333.32 cw(c6839.79,317.11) 6839.79,340.04 cw(c6839.79,362.98) v1@6823.57,346.76 ; SW8.15@6882.35,369.76 cw(c6877.7,358.38) 6890,358.38 ; SW8.15@6883.86,373.46 cw(c6880.13,364.33) 6890,364.33 cw(c6899.87,364.33) SW8.15@6896.14,373.46 ; SW8.15@6890,414.29 6890,358.37 ; SW8.15@6897.65,369.76 ccw(c6902.3,358.38) 6890,358.38 ; 5245.32,3809.1 ccw(c5258.13,3796.3) 5240.02,3796.3 cw(c5258.13,3796.3) 5245.32,3809.1 ; 5245.32,3809.1 cw(c5232.52,3821.91) 5232.52,3803.8 ccw(c5232.52,3821.91) 5245.32,3809.1
  MidLayer1 w4: v4@5083.06,823.06 ccw(c5066.31,806.31) 5066.31,830 ccw(c5066.31,853.69) v4@5083.06,836.94 ; v4@5085.89,825.89 ccw(c5075.97,815.97) 5075.97,830 ccw(c5075.97,844.03) v4@5085.89,834.11 ; v4(5090,830) 5065,830 5048.19,813.19 5048.19,366.81 5058.27,356.73 5135,356.73 v4(5166.73,325) ; v1@5138.28,2581.72 ccw(c5133.68,2586.32) 5140.19,2586.32 ; 5140.19,2590.23 ccw(c5160.23,2590.23) v1@5146.06,2576.06 ; 5140.19,2599.89 ccw(c5169.89,2599.89) v1@5148.89,2578.89 ; 5140.19,2609.55 ccw(c5179.55,2609.55) v1@5151.72,2581.72 ; v1@5146.78,2576.78 5140.19,2583.37 5140.19,2850.04 5131.86,2858.37 5061.63,2858.37 5048.69,2871.31 5048.69,2933.69 5062.71,2947.71 5072.71,2947.71 5089.25,2964.25 5089.25,2982.94 5156.52,3050.21 5156.52,3225.71 5189.19,3258.37 5223.86,3293.04 5223.86,3517.35 5216.86,3524.35 5216.86,3605 5232.52,3620.66 5232.52,3660 5232.52,3670 5232.52,3718.62 v3(5232.52,3796.3) ; v4@5156.92,325 ccw(c5133.23,325) 5149.98,341.75 ccw(c5166.73,358.5) v4@5166.73,334.81 ; v4@5160.92,325 ccw(c5146.89,325) 5156.81,334.92 ccw(c5166.73,344.84) v4@5166.73,330.81 ; v3@5227.33,3791.11 cw(c5214.79,3778.57) 5232.52,3778.57 cw(c5250.25,3778.57) v3@5237.71,3791.11 ; 5232.52,3778.19 cw(c5250.63,3778.19) 5237.82,3791 ccw(c5250.63,3778.19) 5232.52,3778.19 ; 5232.52,3778.19 ccw(c5214.41,3778.19) 5227.22,3791 cw(c5214.41,3778.19) 5232.52,3778.19
  MidLayer2 w4: v4@5159.79,318.06 cw(c5143.04,301.31) 5166.73,301.31 cw(c5190.41,301.31) v4@5173.67,318.06 ; v4@5162.62,320.89 cw(c5152.7,310.97) 5166.73,310.97 cw(c5180.76,310.97) v4@5170.84,320.89 ; v4(5166.73,325) 5166.73,281.84 5240.19,208.37 5398.52,208.37 5431.86,241.71 6473.52,241.71 6485.89,254.08 6730.89,254.08 v1(6816.86,340.04) ; v1@6807.36,340.04 cw(c6784.42,340.04) 6800.64,323.82 cw(c6816.86,307.61) v1@6816.86,330.54 ; v1@6811.36,340.04 cw(c6798.08,340.04) 6807.47,330.65 cw(c6816.86,321.26) v1@6816.86,334.54
  Bottom Layer w4: R242.1@5061.12,2381.45 ccw(c5061.63,2405.49) 5078.63,2388.48 ; R242.1@5061.18,2383.64 5073.79,2383.64 5098.52,2408.37 ; R242.1@5061.21,2385.45 ccw(c5061.91,2418.47) 5085.26,2395.11 ; R242.1@5061.29,2389.45 ccw(c5062.18,2431.46) 5091.89,2401.74 ; R242.1@5061.38,2393.44 ccw(c5062.45,2444.44) 5098.52,2408.37 ; v1@5148.52,2575 5148.52,2560.04 5165.19,2543.37 5165.19,2500.04 ; v1@5191.81,2493.32 ccw(c5175.59,2477.11) 5175.59,2500.04 ccw(c5175.59,2522.98) v1@5191.81,2506.76 ; v1@5194.64,2496.15 ccw(c5185.25,2486.76) 5185.25,2500.04 ccw(c5185.25,2513.32) v1@5194.64,2503.93 ; v1(5198.52,2500.04) 5165.19,2500.04 ; 5098.52,2408.37 5123.52,2408.37 5165.19,2450.04 5165.19,2500.04
  other v1: 5145,2575
DIPSW.D2: R241.1 SW8.14 U8.AB10 | length 6545.4
  Top Layer w4: v1@5053.28,2958.28 ccw(c5037.06,2942.06) 5037.06,2965 ccw(c5037.06,2987.93) v1@5053.28,2971.72 ; v1@5056.11,2961.11 ccw(c5046.72,2951.72) 5046.72,2965 ccw(c5046.72,2978.28) v1@5056.11,2968.89 ; v1(5060,2965) 5030,2965 5014.52,2949.52 5014.52,2875.29 5092.57,2797.25 5092.67,2797.25 5106.55,2783.37 5156.86,2783.37 5165.19,2775.04 5165.19,2675.04 5215.19,2625.04 5215.19,2545.19 5181.02,2511.02 5181.02,2316.02 5173.37,2308.37 5140.19,2308.37 5107,2341.56 5107,2432.85 v1(5107.52,2433.37) ; v1@5100.81,2426.66 cw(c5085.85,2411.71) 5107,2411.71 ; v1@5103.64,2429.49 cw(c5095.51,2421.36) 5107,2421.36 ; 5107,2409.17 cw(c5131.72,2409.17) v1@5114.24,2426.66 ; 5107,2418.83 cw(c5122.07,2418.83) v1@5111.41,2429.49 ; v3(5232.52,3835.67) U8.AB10@5252.2,3855.35 ; U8.AB10@5244.7,3855.35 cw(c5226.6,3855.35) 5239.4,3842.55 cw(c5252.2,3829.75) U8.AB10@5252.2,3847.85 ; U8.AB10@5244.86,3855.35 cw(c5227.14,3855.35) 5239.67,3842.82 cw(c5252.2,3830.29) U8.AB10@5252.2,3848.01 ; SW8.14@6983.36,369.38 cw(c6980.11,360.04) v1@6990,360.04 ; v1@6983.47,356.76 ccw(c6967.71,372.52) SW8.14@6990,372.52 ; SW8.14@6984.67,373.16 cw(c6982.07,365.67) 6990,365.67 cw(c6997.93,365.67) SW8.14@6995.33,373.16 ; v1@6986.3,353.93 ccw(c6977.37,362.86) 6990,362.86 ; 6990,363.78 ccw(c7003.93,363.78) v1@6994.08,353.93 ; SW8.14@6990,373.43 ccw(c7013.58,373.43) v1@6996.91,356.76 ; SW8.14@6990,414.29 v1@6990,360.04 ; v1(6990.19,350.04) 6981.86,358.37 6988.33,358.37 v1@6990,360.04 ; SW8.14@6996.64,369.38 ccw(c6999.89,360.04) v1@6990,360.04 ; 5245.32,3848.47 cw(c5232.52,3861.28) 5232.52,3843.17 ccw(c5232.52,3861.28) 5245.32,3848.47 ; 5245.32,3848.47 ccw(c5258.13,3835.67) 5240.02,3835.67 cw(c5258.13,3835.67) 5245.32,3848.47
  MidLayer1 w4: v1@4933.47,1591.76 ccw(c4917.26,1607.98) 4940.19,1607.98 ccw(c4963.13,1607.98) v1@4946.91,1591.76 ; v1@4936.3,1588.93 ccw(c4926.91,1598.32) 4940.19,1598.32 ccw(c4953.47,1598.32) v1@4944.08,1588.93 ; v1(4940.19,1585.04) 4940.19,1645 4957.19,1662 4957.19,2283.04 5075.26,2401.11 v1(5107.52,2433.37) ; v1(5060,2965) 5148.52,3053.52 5148.52,3229.02 5215.86,3296.35 5215.86,3514.04 5208.86,3521.04 5208.86,3608.31 5217.01,3616.47 5217.01,3660 5217.01,3670 5217.01,3718.62 5217.01,3812.16 ; v1@5060,2970.5 ccw(c5060,2983.78) 5069.39,2974.39 ccw(c5078.78,2965) v1@5065.5,2965 ; v1@5060,2974.5 ccw(c5060,2997.43) 5076.22,2981.22 ccw(c5092.43,2965) v1@5069.5,2965 ; v1@5098.02,2433.37 cw(c5075.09,2433.37) 5091.31,2417.16 cw(c5107.52,2400.94) v1@5107.52,2423.87 ; v1@5102.02,2433.37 cw(c5088.75,2433.37) 5098.14,2423.99 cw(c5107.52,2414.6) v1@5107.52,2427.87 ; 5217.01,3798.23 5217.01,3812.16 ; 5221.13,3822.09 ccw(c5231.06,3812.16) 5217.01,3812.16 ; v3@5225.05,3835.02 cw(c5207.01,3833.44) 5220.88,3821.8 cw(c5234.75,3810.16) v3@5233.17,3828.2
  MidLayer2 w4: v1@4940.19,1575.54 cw(c4940.19,1552.61) 4956.41,1568.82 cw(c4972.63,1585.04) v1@4949.69,1585.04 ; v1@4940.19,1579.54 cw(c4940.19,1566.26) 4949.58,1575.65 cw(c4958.97,1585.04) v1@4945.69,1585.04 ; v1(4940.19,1585.04) 5000.19,1525.04 5141.86,1383.37 5275.9,1383.37 5425.9,1233.37 5564.18,1233.37 5584.09,1253.29 5686.95,1253.29 5724.02,1216.21 5894.69,1216.21 5919.69,1241.21 6039.05,1241.21 6125.25,1155 6138.52,1155 6148.52,1145 6148.52,983.37 6190.19,941.71 6458.29,941.71 6691.77,708.23 6691.77,648.46 v1(6990.19,350.04) ; v1@6980.69,350.04 ccw(c6957.76,350.04) 6973.97,366.26 ccw(c6990.19,382.48) v1@6990.19,359.54 ; v1@6984.69,350.04 ccw(c6971.41,350.04) 6980.8,359.43 ccw(c6990.19,368.82) v1@6990.19,355.54
  Bottom Layer w4: R241.1@5061.18,2439.55 5061.18,2441.71 5099.19,2441.71 v1(5107.52,2433.37) ; R241.1@5064.47,2441.71 cw(c5064.47,2390.32) v1@5100.81,2426.66 ; R241.1@5064.94,2436.28 cw(c5078.06,2423.16) 5078.06,2441.71 ; R241.1@5067.77,2433.45 cw(c5087.71,2413.51) 5087.71,2441.71 ; R241.1@5067.77,2446.63 ccw(c5079.65,2458.5) 5079.65,2441.71 ; 5074.13,2441.71 cw(c5074.13,2399.98) v1@5103.64,2429.49 ; 5083.79,2441.71 cw(c5083.79,2409.64) v1@5106.46,2432.31 ; 5093.44,2441.71 cw(c5093.44,2419.29) v1@5109.29,2435.14
DIPSW.D3: R240.1 SW8.13 U8.AD9 | length 5990.6
  Top Layer w4: 5095,2342.25 5148,2289.25 5148,2038.18 5143.19,2033.37 5123.52,2013.71 5123.52,1447.06 5114.86,1438.39 5114.86,1275.37 v1(5131.86,1258.37) ; 5100,2337.25 5090.02,2347.23 5090.02,2450.02 5100,2460 v1(5140,2460) 5140,2522.5 5162.5,2545 5162.5,2597.02 5131.69,2627.83 5131.69,2652.27 5110.5,2673.46 5110.5,2756.79 5092.09,2775.21 ; v1@5122.36,1258.37 ccw(c5099.42,1258.37) 5115.64,1274.59 ccw(c5131.86,1290.81) v1@5131.86,1267.87 ; v1@5126.36,1258.37 ccw(c5113.08,1258.37) 5122.47,1267.76 ccw(c5131.86,1277.15) v1@5131.86,1263.87 ; v1@5133.28,2453.28 ccw(c5117.06,2437.06) 5117.06,2460 ccw(c5117.06,2482.93) 5133.28,2466.72 ccw(c5117.06,2482.93) 5140,2482.93 ccw(c5162.93,2482.93) v1@5146.72,2466.72 ; v1@5136.11,2456.11 ccw(c5126.72,2446.72) 5126.72,2460 ccw(c5126.72,2473.28) 5136.11,2463.89 ccw(c5126.72,2473.28) 5140,2473.28 ccw(c5153.28,2473.28) v1@5143.89,2463.89 ; 5156.86,3488.04 5152.19,3483.37 ; U8.AD9@5205.49,3776.61 cw(c5187.77,3776.61) 5200.3,3764.08 ; U8.AD9@5212.83,3769.27 ccw(c5212.83,3751.55) 5200.3,3764.08 ; SW8.13@7090,414.29 7090,408.37 7115.19,408.37 ; SW8.13@7107.4,403.94 cw(c7115.19,399.31) 7115.19,408.37 ; v1@7122.36,425.04 cw(c7099.42,425.04) 7115.64,408.82 cw(c7131.86,392.61) v1@7131.86,415.54 ; v1@7126.36,425.04 cw(c7113.08,425.04) 7122.47,415.65 cw(c7131.86,406.26) v1@7131.86,419.54 ; v1(7131.86,425.04) 7115.19,408.37 ; 5084.31,2782.87 4998.52,2868.66 4998.52,2958.02 4973.52,2983.02 4973.52,3122.06 5039.19,3187.73 5039.19,3219.71 5050.19,3230.71 5062.52,3230.71 5110.86,3279.04 5110.86,3416.71 5090.19,3437.37 5090.19,3458.37 5115.19,3483.37 5152.19,3483.37 ; 5084.31,2782.87 5091.98,2775.21 5092.09,2775.21 ; 5084.31,2782.87 5084.42,2782.87 5092.09,2775.21 ; 5152.19,3483.37 5190.02,3521.21 5190.02,3570.54 5185.02,3575.54 5185.02,3616.54 5188.97,3620.49 5188.97,3660 5188.97,3670 5188.97,3672.79 5188.97,3736.73 cw(c5227.65,3736.73) 5200.3,3764.08
  Bottom Layer w4: R240.1@5061.18,2495.45 5104.55,2495.45 v1(5140,2460) ; R240.1@5064.94,2491.69 cw(c5074.02,2482.61) 5074.02,2495.45 cw(c5074.02,2508.3) R240.1@5064.94,2499.22 ; R240.1@5067.77,2488.86 cw(c5083.68,2472.96) 5083.68,2495.45 cw(c5083.68,2517.95) R240.1@5067.77,2502.04 ; v1@5130.5,2460 ccw(c5107.56,2460) 5123.78,2476.22 ccw(c5140,2492.43) v1@5140,2469.5 ; v1(5131.86,1258.37) 5165,1258.37 5182,1275.37 5472.58,1275.37 5489.58,1258.37 5646.96,1101 5780.29,1101 5842.29,1039 5909.94,1039 6007.23,941.71 6472.8,941.71 6498.13,967.04 6797.96,967.04 7040,725 7040,516.9 v1(7131.86,425.04) ; v1@5134.5,2460 ccw(c5121.22,2460) 5130.61,2469.39 ccw(c5140,2478.78) v1@5140,2465.5 ; v1@5135.75,1254.49 cw(c5145.14,1245.1) 5145.14,1258.37 cw(c5145.14,1271.65) v1@5135.75,1262.26 ; v1@5138.57,1251.66 cw(c5154.79,1235.44) 5154.79,1258.37 cw(c5154.79,1281.31) v1@5138.57,1265.09 ; v1@7122.36,425.04 ccw(c7099.42,425.04) 7115.64,441.26 ccw(c7131.86,457.48) v1@7131.86,434.54 ; v1@7126.36,425.04 ccw(c7113.08,425.04) 7122.47,434.43 ccw(c7131.86,443.82) v1@7131.86,430.54
DIPSW.D4: R239.1 SW8.12 U8.AF7 | length 6536.2
  Top Layer w4: v1@4953.28,2536.72 ccw(c4937.06,2552.93) 4960,2552.93 ccw(c4982.93,2552.93) v1@4966.72,2536.72 ; v1@4956.11,2533.89 ccw(c4946.72,2543.28) 4960,2543.28 ccw(c4973.28,2543.28) v1@4963.89,2533.89 ; v1(4960,2530) 4960,2605 4974.02,2619.02 4974.02,2655.98 4937.5,2692.5 4937.5,2735.64 4981.86,2780 4981.86,2950.04 4956.86,2975.04 4956.86,3132.71 4981.86,3157.71 4981.86,3195.37 v1(5053.19,3266.71) ; v1@5043.69,3266.71 cw(c5020.76,3266.71) 5036.97,3250.49 cw(c5053.19,3234.27) v1@5053.19,3257.21 ; v1@5047.69,3266.71 cw(c5034.41,3266.71) 5043.8,3257.32 cw(c5053.19,3247.93) v1@5053.19,3261.21 ; v1(5123.86,3554.37) 5134.09,3564.61 5134.09,3655.26 5134.09,3660 5134.09,3670 U8.AF7@5134.09,3697.87 ; U8.AF7@5128.79,3692.57 cw(c5115.99,3679.77) 5134.09,3679.77 cw(c5152.2,3679.77) U8.AF7@5139.4,3692.57 ; v1@7165.19,490.54 cw(c7165.19,467.61) 7181.41,483.82 cw(c7197.63,500.04) v1@7174.69,500.04 ; v1@7165.19,494.54 cw(c7165.19,481.26) 7174.58,490.65 cw(c7183.97,500.04) v1@7170.69,500.04 ; v1(7165.19,500.04) 7190.19,475.04 ; SW8.12@7180.07,457.72 ccw(c7170.31,475.04) 7190.19,475.04 ; SW8.12@7182.03,454.23 ccw(c7174.16,468.2) 7190.19,468.2 ; SW8.12@7190,414.29 7190,440.08 7190.19,440.08 7190.19,475.04 ; 7190.19,468.07 ccw(c7206.37,468.07) SW8.12@7198.2,454.1 ; SW8.12@7200.22,457.55 cw(c7210.45,475.04) 7190.19,475.04 ; 5134.09,3680.15 ccw(c5116.37,3680.15) 5128.9,3692.68 cw(c5116.37,3680.15) 5134.09,3680.15 ; 5134.09,3680.15 cw(c5151.82,3680.15) 5139.29,3692.68 ccw(c5151.82,3680.15) 5134.09,3680.15
  MidLayer1 w4: v1@4960,2520.5 cw(c4960,2497.56) 4976.22,2513.78 cw(c4992.43,2530) v1@4969.5,2530 ; v1@4960,2524.5 cw(c4960,2511.22) 4969.39,2520.61 cw(c4978.78,2530) v1@4965.5,2530 ; v1@4960,2529.16 v1(4960,2530) 4990,2500 4990,2441.52 4940.19,2391.71 4940.19,2366.71 4817.47,2243.99 4731.19,2157.71 4731.19,1970.15 4732.34,1969 4732.34,1941 4731.19,1939.85 4731.19,1348.34 5211.53,868 6082,868 6297.69,652.31 6297.69,500 6362.69,435 6475.15,435 6540.19,500.04 v1(7165.19,500.04) ; v1@7158.47,493.32 ccw(c7142.26,477.11) 7142.26,500.04 ccw(c7142.26,522.98) v1@7158.47,506.76 ; v1@7161.3,496.15 ccw(c7151.91,486.76) 7151.91,500.04 ccw(c7151.91,513.32) v1@7161.3,503.93
  MidLayer2 w4: v1@5043.69,3266.71 ccw(c5020.76,3266.71) 5036.97,3282.93 ccw(c5053.19,3299.14) v1@5053.19,3276.21 ; v1@5047.69,3266.71 ccw(c5034.41,3266.71) 5043.8,3276.1 ccw(c5053.19,3285.49) v1@5053.19,3272.21 ; v1(5053.19,3266.71) 5015.19,3304.71 5015.19,3341.37 5023.52,3349.71 5124.52,3349.71 5140.19,3365.37 5140.19,3477.71 5106.86,3511.04 5106.86,3537.37 v1(5123.86,3554.37) ; v1@5114.36,3554.37 cw(c5091.42,3554.37) 5107.64,3538.16 cw(c5123.86,3521.94) v1@5123.86,3544.87 ; v1@5118.36,3554.37 cw(c5105.08,3554.37) 5114.47,3544.99 cw(c5123.86,3535.6) v1@5123.86,3548.87
  Bottom Layer w4: v1(4960,2530) 4964.96,2525.04 5047.85,2525.04 5061.18,2538.37 R239.1@5061.18,2551.36 ; v1@4961.06,2531.06 ccw(c4975.59,2545.59) 4975.59,2525.04 ; v1@4963.89,2533.89 ccw(c4985.25,2555.25) 4985.25,2525.04 ; v1@4966.72,2523.28 cw(c4970.96,2519.04) 4970.96,2525.04 ; v1@4966.72,2536.72 ccw(c4994.91,2564.91) 4994.91,2525.04 ; 5054.1,2531.29 ccw(c5047.34,2538.04) R239.1@5054.35,2544.54 ; 5057.03,2534.23 ccw(c5050.39,2540.87) R239.1@5057.28,2547.26 ; 5059.97,2537.16 ccw(c5053.44,2543.7) R239.1@5060.21,2549.97
DIPSW.D5: R238.1 SW8.11 U8.AA9 | length 5936.8
  Top Layer w4: v3(5193.15,3875.04) U8.AA9@5212.83,3894.72 ; U8.AA9@5205.33,3894.72 cw(c5187.23,3894.72) 5200.03,3881.92 cw(c5212.83,3869.12) U8.AA9@5212.83,3887.22 ; U8.AA9@5205.49,3894.72 cw(c5187.77,3894.72) 5200.3,3882.19 cw(c5212.83,3869.66) U8.AA9@5212.83,3887.38 ; v1(6759.19,608.37) 7106.63,608.37 7223,492 7278,492 7290,480 SW8.11@7290,414.29 ; v1@6763.08,604.49 cw(c6772.47,595.1) 6772.47,608.37 cw(c6772.47,621.65) v1@6763.08,612.26 ; v1@6765.91,601.66 cw(c6782.13,585.44) 6782.13,608.37 cw(c6782.13,631.31) v1@6765.91,615.09 ; SW8.11@7278.04,456.41 ccw(c7260.76,480) 7290,480 ccw(c7319.24,480) SW8.11@7301.96,456.41 ; SW8.11@7280.4,453.18 ccw(c7266.54,472.11) 7290,472.11 ccw(c7313.46,472.11) SW8.11@7299.6,453.18 ; SW8.11@7282.77,449.96 ccw(c7272.32,464.22) 7290,464.22 ccw(c7307.68,464.22) SW8.11@7297.23,449.96 ; 5205.95,3887.84 cw(c5193.15,3900.65) 5193.15,3882.54 ccw(c5193.15,3900.65) 5205.95,3887.84 ; 5205.95,3887.84 ccw(c5218.76,3875.04) 5200.65,3875.04 cw(c5218.76,3875.04) 5205.95,3887.84
  MidLayer1 w4: v1(5105,2630) 5109.82,2630 5123.52,2643.71 ; v1@5106.33,2635.34 ccw(c5109.45,2647.79) 5118.53,2638.71 ; v1@5107.31,2639.22 ccw(c5111.45,2655.78) 5123.52,2643.71 ; v1@5114.5,2630 cw(c5125.81,2630) 5117.81,2638 ; 5169.29,3798.23 5169.29,3812.16 ; v3@5185.68,3874.39 cw(c5167.64,3872.81) 5181.51,3861.17 ; v3@5193.8,3867.57 ccw(c5195.38,3849.53) 5181.51,3861.17 ; v1@5383.52,2480.54 cw(c5383.52,2457.61) 5399.74,2473.82 cw(c5415.96,2490.04) v1@5393.02,2490.04 ; v1@5383.52,2484.54 cw(c5383.52,2471.26) 5392.91,2480.65 cw(c5402.3,2490.04) v1@5389.02,2490.04 ; v1(5383.52,2490.04) 5401.52,2472.04 5401.52,2425 5407.19,2419.33 5407.19,1326.18 5500,1233.37 5873.52,1233.37 6498.52,608.37 v1(6759.19,608.37) ; v1@6752.47,601.66 ccw(c6736.26,585.44) 6736.26,608.37 ccw(c6736.26,631.31) v1@6752.47,615.09 ; v1@6755.3,604.49 ccw(c6745.91,595.1) 6745.91,608.37 ccw(c6745.91,621.65) v1@6755.3,612.26 ; 5123.52,2643.71 5123.52,2738.73 5031.86,2830.39 5031.86,3110.67 5081.19,3160 5081.19,3234.04 5106.5,3259.35 5106.5,3349.68 5106.86,3350.04 5140.19,3383.37 5148.86,3392.04 5148.86,3489.67 5176.52,3517.34 5176.52,3577.71 5169.29,3584.94 5169.29,3660 5169.29,3670 5169.29,3718.62 5169.29,3738.04 5169.29,3812.16 ; 5169.29,3812.16 5169.29,3831.66 cw(c5211.02,3831.66) 5181.51,3861.17
  Bottom Layer w4: R238.1@5061.18,2607.27 5061.18,2608.37 5088.19,2608.37 5107.41,2627.59 v1@5109.82,2630 ; R238.1@5064.94,2604 cw(c5075.5,2593.45) 5075.5,2608.37 ; R238.1@5064.94,2611.53 ccw(c5072.55,2619.13) 5072.55,2608.37 ; R238.1@5067.77,2601.17 cw(c5085.15,2583.79) 5085.15,2608.37 ; R238.1@5067.77,2614.35 ccw(c5082.2,2628.79) 5082.2,2608.37 ; 5090.6,2610.78 ccw(c5077.27,2624.11) v1@5095.71,2628.03 ; 5095.81,2615.99 ccw(c5085.87,2625.94) v1@5099.62,2628.86 ; 5097,2617.19 cw(c5105,2609.19) v1@5105,2620.5 ; v1(5105,2630) v1@5109.82,2630 ; v1@5105.22,2628.52 cw(c5107.83,2610.93) 5120.4,2623.5 ; v1@5105.81,2624.56 cw(c5109.28,2601.14) 5126.02,2617.88 ; v1@5374.02,2490.04 ccw(c5351.09,2490.04) 5367.31,2506.26 ccw(c5383.52,2522.48) v1@5383.52,2499.54 ; v1@5378.02,2490.04 ccw(c5364.75,2490.04) 5374.14,2499.43 ccw(c5383.52,2508.82) v1@5383.52,2495.54 ; v1(5383.52,2490.04) 5256.86,2616.71 5127.19,2616.71 v1@5111.86,2632.04 ; v1@5109.82,2630 v1@5111.86,2632.04 ; v1@5109.82,2630 v1@5111.86,2632.04
DIPSW.D6: R237.1 SW8.10 U8.AC7 | length 6305.4
  Top Layer w4: v3(5114.41,3796.3) U8.AC7@5134.09,3815.98 ; U8.AC7@5126.59,3815.98 cw(c5108.49,3815.98) 5121.29,3803.18 cw(c5134.09,3790.38) U8.AC7@5134.09,3808.48 ; U8.AC7@5126.75,3815.98 cw(c5109.03,3815.98) 5121.56,3803.45 cw(c5134.09,3790.92) U8.AC7@5134.09,3808.64 ; v1@6731.86,690.54 cw(c6731.86,667.61) 6748.07,683.82 cw(c6764.29,700.04) v1@6741.36,700.04 ; v1@6731.86,694.54 cw(c6731.86,681.26) 6741.25,690.65 cw(c6750.64,700.04) v1@6737.36,700.04 ; v1(6731.86,700.04) 6811.9,620 7110,620 7230,500 7370,500 7390,480 ; SW8.10@7378.04,456.41 ccw(c7360.78,479.99) 7390,479.99 ; SW8.10@7380.41,453.19 ccw(c7366.55,472.11) 7390,472.11 ccw(c7413.46,472.11) SW8.10@7399.6,453.18 ; SW8.10@7382.77,449.96 ccw(c7372.33,464.22) 7390,464.22 ccw(c7407.68,464.22) SW8.10@7397.24,449.96 ; SW8.10@7390,414.29 7390,416.71 7390,480 ; SW8.10@7401.96,456.41 cw(c7419.24,479.99) 7390,479.99 ; 5127.21,3809.1 cw(c5114.41,3821.91) 5114.41,3803.8 ccw(c5114.41,3821.91) 5127.21,3809.1 ; 5127.21,3809.1 ccw(c5140.02,3796.3) 5121.91,3796.3 cw(c5140.02,3796.3) 5127.21,3809.1
  MidLayer1 w4: v1@5075.5,2695 ccw(c5052.56,2695) 5068.78,2711.22 ccw(c5085,2727.43) v1@5085,2704.5 ; v1@5079.5,2695 ccw(c5066.22,2695) 5075.61,2704.39 ccw(c5085,2713.78) v1@5085,2700.5 ; v1(5085,2695) 5060,2720 5060,2724.88 4981.86,2803.02 4981.86,3149.35 4989.19,3156.69 4989.19,3376.75 5040.94,3428.5 5082.98,3428.5 5096.19,3441.71 5096.19,3572.71 5114.41,3590.93 5114.41,3660 5114.41,3670 5114.41,3718.62 v3(5114.41,3796.3) ; v3@5109.22,3791.11 cw(c5096.68,3778.57) 5114.41,3778.57 cw(c5132.14,3778.57) v3@5119.6,3791.11 ; v1(5485.19,2221.71) 5473.52,2210.04 5473.52,1736.71 6085.19,1125.04 6510.19,700.04 v1(6731.86,700.04) ; v1@6725.14,693.32 ccw(c6708.92,677.11) 6708.92,700.04 ccw(c6708.92,722.98) v1@6725.14,706.76 ; v1@6727.97,696.15 ccw(c6718.58,686.76) 6718.58,700.04 ccw(c6718.58,713.32) v1@6727.97,703.93 ; 5114.41,3778.19 cw(c5132.52,3778.19) 5119.71,3791 ccw(c5132.52,3778.19) 5114.41,3778.19 ; 5114.41,3778.19 ccw(c5096.3,3778.19) 5109.11,3791 cw(c5096.3,3778.19) 5114.41,3778.19
  Bottom Layer w4: 5044.43,2646.43 cw(c5061.18,2629.68) R237.1@5061.18,2653.37 ; 5045.62,2647.62 ccw(c5030.55,2662.69) R237.1@5051.86,2662.69 ; R237.1@5051.26,2653.26 cw(c5061.18,2643.34) R237.1@5061.18,2657.37 ; R237.1@5052.45,2654.45 ccw(c5044.21,2662.69) R237.1@5055.86,2662.69 ; R237.1@5065,2659.48 cw(c5073.74,2651.02) 5073.74,2663.18 cw(c5073.74,2675.34) R237.1@5065,2666.88 ; R237.1@5067.88,2656.7 cw(c5083.18,2641.87) 5083.18,2663.18 ; R237.1@5067.88,2669.66 ccw(c5083.18,2684.49) 5083.18,2663.18 ; v1@5078.28,2688.28 cw(c5062.06,2672.06) 5085,2672.06 cw(c5107.93,2672.06) v1@5091.72,2688.28 ; v1@5081.11,2691.11 cw(c5071.72,2681.72) 5085,2681.72 cw(c5098.28,2681.72) v1@5088.89,2691.11 ; v1(5085,2695) 5085,2665 5083.18,2663.18 ; v1@5485.19,2212.21 cw(c5485.19,2189.27) 5501.41,2205.49 cw(c5517.63,2221.71) v1@5494.69,2221.71 ; v1@5485.19,2216.21 cw(c5485.19,2202.93) 5494.58,2212.32 cw(c5503.97,2221.71) v1@5490.69,2221.71 ; v1(5485.19,2221.71) 5515.19,2191.71 5548.52,2191.71 5565.19,2175.04 5565.19,2091.71 5556.86,2083.37 5231.86,2083.37 5206.86,2108.37 5206.86,2441.71 5223.52,2458.37 5223.52,2525.04 5148.52,2600.04 5139.19,2600.04 5122.52,2583.37 5048.52,2583.37 5040.19,2591.71 5040.19,2642.19 R237.1@5061.18,2663.18 5083.18,2663.18